# Altium PCB Sound_Sensor_v3.1.PcbDoc (part 2 of 3)
Units mm, origin at the board's own origin, x right, y up, seen from the top; angles counter-clockwise.
Board outline 69.99 x 68.25 mm, 2 copper layers (Top Layer, Bottom Layer), stack 1.448 mm thick; 83 components, 60 nets, 303 pads, 87 vias.
Unrouted connection lines stored in the file: 2.
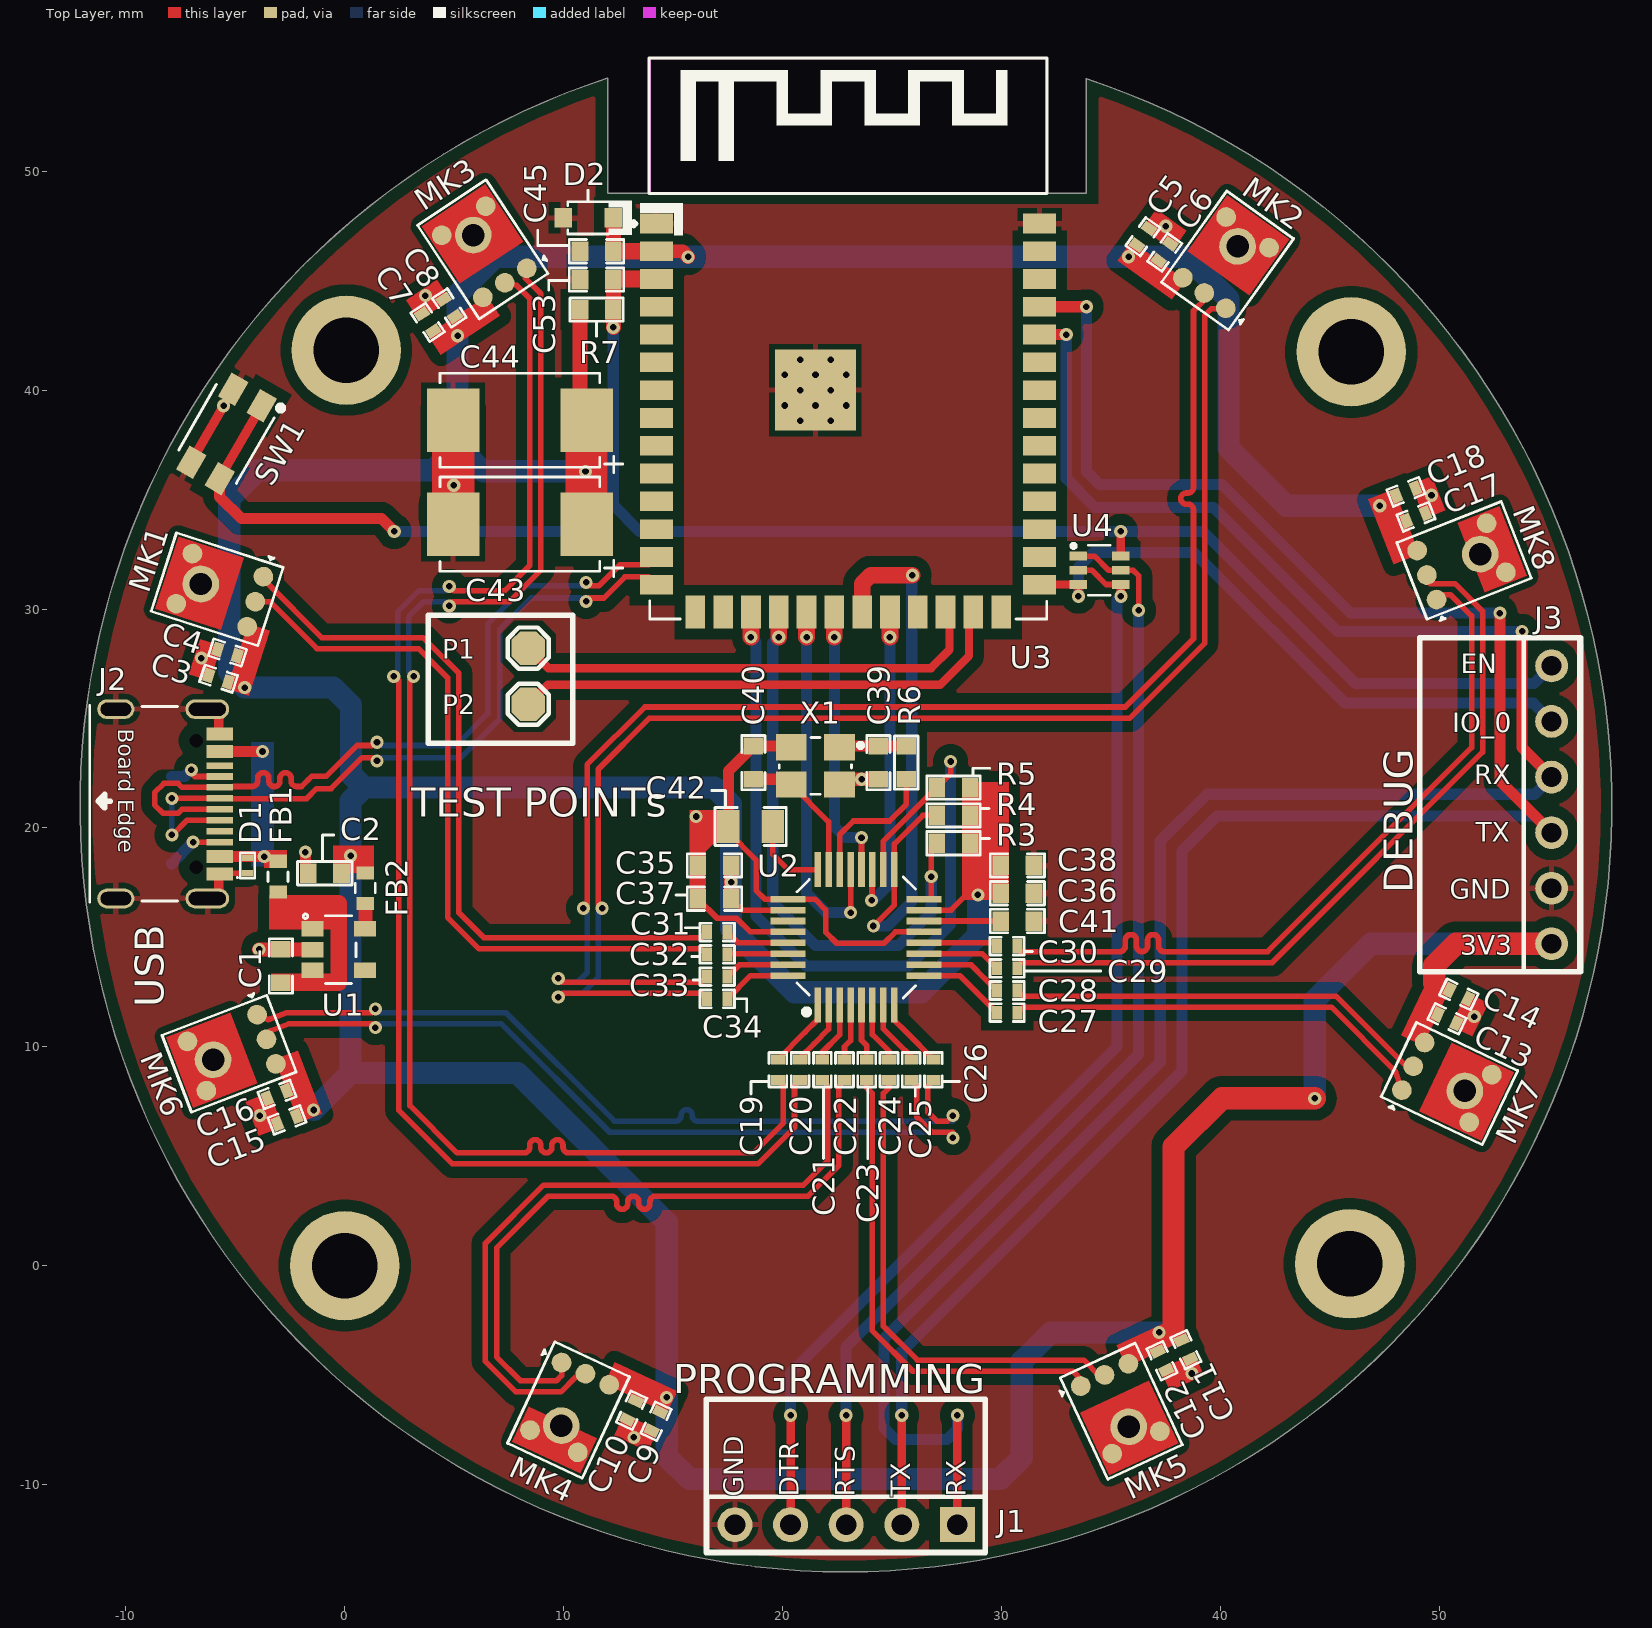
[diagram p0: Top Layer view]

## Part data (continued)
R3 R4 R5: library part CRGH0603J100K, "RES SMD 100K OHM 5% 1/5W 0603", Case Code (Imperial)=0603, Case Code (Metric)=1608, LCSC Part Number=C2074142, Manufacturer="TE Connectivity", Max Operating Temperature=125°C, Min Operating Temperature=-55°C, Number of Resistors=1, Power Rating=200mW, Resistance=100kR, Resistance Tolerance=5%, Resistor Type="Thick Film,Power resistor", Supplier Part Number 1=A126393DKR-ND, Temperature Coefficient=100ppm/°C, Voltage Rating=50V, Case/Package=0603, ComponentLink1Description=http://www.farnell.com/datasheets/2007183.pdf?src-supplier=Element14, ComponentLink1URL=http://www.farnell.com/datasheets/2007183.pdf?src-supplier=Element14, Depth=0.8mm, ELV=Compliant, Height=0.45mm, Item Type=Resistor, Length=1.6mm, Manufacturer Part Number=CRGH0603J100K, Mount="Surface Mount", Number of Terminations=2, Packaging="Tape and Reel", Pricing 1="1=0.1, 10=0.049, 100=0.02, 1000=0.00899, 2500=0.0078 (USD)", REACH SVHC="No SVHC", RoHS Compliant=Yes, Series=CRGH, Stock 1=23277, Supplier 1=Digi-Key, Technology="THICK FILM", Termination=Solder, Tolerance=5%, Voltage Rating (DC)=50V, Width=0.8mm
R6: library part RC0603JR-070RL, "RES 0 OHM JUMPER 1/10W 0603", Case Code (Imperial)=0603, Case Code (Metric)=1608, LCSC Part Number=C95177, Manufacturer=Yageo, Max Operating Temperature=155°C, Max Power Dissipation=100mW, Min Operating Temperature=-55°C, Package Quantity=5000, Resistance=0mR, Resistance Tolerance=5%, Resistor Type="Thick Film", Supplier Part Number 1=311-0.0GRCT-ND, Temperature Coefficient=200ppm/°C, Tolerance=1%, Voltage Rating=50V, Case/Package=0603, Category="Chip SMD Resistors", Construction=Rectangular, Contact Plating=Tin,Matte, Depth=0.8mm, Features="Moisture Resistant", Height=0.45mm, Item Type=Resistor, Lead Free="Lead Free", Length=1.6mm, Manufacturer Part Number=RC0603JR-070RL, Military Standard=Not, Number of Pins=2, Number of Terminations=2, Packaging="Tape and Reel", Power Rating=100mW, Pricing 1="1=0.10000, 10=0.01700, 25=0.01240, 50=0.00960, 100=0.00700, 250=0.00536, 500=0.00430, 1000=0.00316 (USD)", Radiation Hardening=No, Reach SVHC Compliant="No SVHC", RoHS=Yes, RoHS Compliant=Yes, Series=RC, Size Code=0603, Stock 1=18081776, Supplier 1=Digi-Key, Technology="THICK FILM", Termination=SMD/SMT, Voltage Rating (DC)=50V, Width=0.8mm
R7: library part AC0603JR-0710KL, "RES SMD 10K OHM 5% 1/10W 0603", Case Code (Imperial)=0603, Case Code (Metric)=1608, LCSC Part Number=C140867, Manufacturer=Yageo, Max Operating Temperature=155°C, Max Power Dissipation=100mW, Min Operating Temperature=-55°C, Package Quantity=1, Resistance=10kR, Resistor Type="Thick Film", Supplier Part Number 1=1029044, Temperature Coefficient=100ppm/°C, Tolerance=5%, Voltage Rating=50V, Case/Package=0603, Category="Chip SMD Resistors", ComponentLink1Description=https://datasheet.ciiva.com/5562/pyu-ac-51-rohs-l-2-5562553.pdf?src-supplier=Mouser, ComponentLink1URL=https://datasheet.ciiva.com/5562/pyu-ac-51-rohs-l-2-5562553.pdf?src-supplier=Mouser, Construction=Rectangular, Depth=0.8mm, Features="Moisture Resistant,Automotive AEC-Q200,Anti-Sulfur", Height=0.022inch, Item Type=Resistor, Lead Free="Lead Free", Length=0.063inch, Manufacturer Part Number=AC0603JR-0710KL, Military Standard=Not, Number of Terminations=2, Packaging="Tape and Reel", Power Rating=100mW, Pricing 1="5000=0.00540 (USD)", RoHS=Yes, RoHS Compliant=Yes, Series=AC, Size Code=0603, Stock 1=1533000, Supplier 1="Future Electronics", Termination=SMD/SMT, Width=0.031inch
SW1: library part TS-1185EC-C-D-B, "3mm 2mm Round Button 50mA Top3.65mm SPST 12V SMD Tactile Switches", Manufacturer=XKB, Package=Custom, ComponentLink1Description=LCSC, ComponentLink1URL=https://lcsc.com/product-detail/Tactile-Switches_XKB-Connectivity-TS-1185EC-C-D-B_C318893.html, Manufacturer Part No=TS-1185EC-C-D-B
U1: "Linear Voltage Regulator IC Positive Fixed 1 Output 3.3V 1A SOT-25", Case/Package=SOT-25, Dropout Voltage=655mV, Manufacturer=Torex, Max Input Voltage=6V, Max Operating Temperature=85°C, Min Current Limit=1.005A, Min Input Voltage=1.6V, Min Operating Temperature=-40°C, Nominal Output Voltage=3.3V, Output Current=1A, Package Quantity=1, Supplier Part Number 1=84R0738, Category="Voltage Regulators - Linear", ComponentLink1Description=https://datasheet.ciiva.com/7992/610888-7992813.pdf?src-supplier=Element14, ComponentLink1URL=https://datasheet.ciiva.com/7992/610888-7992813.pdf?src-supplier=Element14, ComponentLink2Description=https://datasheet.ciiva.com/5755/610888-5755886.pdf?src-supplier=Farnell, ComponentLink2URL=https://datasheet.ciiva.com/5755/610888-5755886.pdf?src-supplier=Farnell, ComponentLink3Description=https://datasheet.ciiva.com/2040/xc6220-2040201.pdf?src-supplier=Digi-Key, ComponentLink3URL=https://datasheet.ciiva.com/2040/xc6220-2040201.pdf?src-supplier=Digi-Key, ComponentLink4Description=https://datasheet.ciiva.com/2040/xc6220-2040200.pdf?src-supplier=Digi-Key, ComponentLink4URL=https://datasheet.ciiva.com/2040/xc6220-2040200.pdf?src-supplier=Digi-Key, ComponentLink5Description=https://datasheet.ciiva.com/2040/xc6220-2040202.pdf?src-supplier=Digi-Key, ComponentLink5URL=https://datasheet.ciiva.com/2040/xc6220-2040202.pdf?src-supplier=Digi-Key, Manufacturer Part Number=XC6220B331MR-G, Mount="Surface Mount", Number of Pins=5, Number of Regulators=1, Output Type=Fixed, Output Voltage=3.3V, Packaging="Tape and Reel", Pricing 1="1=1.20000, 10=1.08000, 100=0.83900, 500=0.69300, 1000=0.54800 (USD)", REACH SVHC="No SVHC", RoHS=Yes, RoHS Compliant=Yes, Series=-, Stock 1=3078, Supplier 1=Newark
U2: "IC ADC 24BIT SIGMA-DELTA 32TQFP", Manufacturer="Texas Instruments", Supplier Part Number 1=595-ADS131M08IPBSR, Category="Analog to Digital Converters (ADCs)", Manufacturer Part Number=ADS131M08IPBSR, Pricing 1="1=8.85000, 10=7.99000, 50=7.62000, 100=6.62000, 1000=5.39000, 10000=5.39000 (USD)", RoHS=Yes, Supplier 1=Mouser
U3: "SMD,18x25.5mm WiFi Modules ROHS", LCSC Part Number=C2913204, Manufacturer="Espressif Systems", Supplier Part Number 1=1965-ESP32-S3-WROOM-1-N8R2-ND, Category=Uncategorized, ComponentLink1Description=LCSC, ComponentLink1URL=https://www.lcsc.com/product-detail/WiFi-Modules_Espressif-Systems-ESP32-S3-WROOM-1-N8R2_C2913204.html, Item Type=Module, Manufacturer Part Number=ESP32-S3-WROOM-1-N8R2, RoHS=No, Supplier 1=Digi-Key
U4: "2 NPN pre-biased (Dual) 150mW 100mA 50V SC-70-6(SOT-363) Digital Transistors ROHS", Manufacturer=Changjiang, Package=SC-70-6(SOT-363), ComponentLink1Description=LCSC, ComponentLink1URL=https://www.lcsc.com/product-detail/Digital-Transistors_Changjiang-Electronics-Tech-CJ-UMH3N_C62892.html, Manufacturer Part No=UMH3N
X1: "8.192MHz SMD Crystal Resonator 12pF 150Ω ±10ppm ±30ppm -40℃~+85℃ SMD_3225_4P Crystals ROHS", Manufacturer=JYJE, Package=Custom, Manufacturer Part No=3TJ481920NYLBC

## Free pads (board coordinates)
  round 5 hole 3: MH1(0.068,41.835) MH2(0,0) MH3(45.923,0.08) MH4(45.992,41.755)

## Via types
v1: diameter 0.6, hole 0.3, Top Layer to Bottom Layer, 87 vias

## Nets (pads, with @x,y where several pads share a name; then routed paths per layer and width w, separated by ;. In a path a pad name is that pad's centre, name@x,y a point inside that pad or via, vN(x,y) a via of type N, cw(c..) or ccw(c..) an arc to the next point about the centre after c; other vN are vias at no path point)
3V3: C2.1 C3.1 C4.1 C5.1 C6.1 C7.1 C8.1 C9.1 C10.1 C11.1 C12.1 C13.1 C14.1 C15.1 C16.1 C17.1 C18.1 C35.1 C36.1 C37.1 C38.1 C43.1 C44.1 C45.1 C46.1 C47.1 C48.1 C49.1 C50.1 C51.1 C52.1 D2.1 FB2.2 J3.6 MK1.5 MK2.5 MK3.5 MK4.5 MK5.5 MK6.5 MK7.5 MK8.5 R3.2 R4.2 R5.2 R7.1 U2.15 U2.26 U3.2 | length 265.6
  Top Layer w0.254: C37.1@17.653,16.764 18.167,16.25 U2.26@20.26,16.25 ; U2.15@26.46,16.25 27.705,16.25 28.499,17.043 28.499,18.625 29.273,19.399 ; v1(28.931,16.942) 29.007,17.018 C36.1@29.972,17.018
  Top Layer w0.381: C2.1@-0.152,17.932 C2.1@-0.102,17.983 ; FB2.2@0.926,17.856 FB2.2@0.94,17.87 ; C45.1@12.275,46.362 D2.1@12.275,47.879
  Top Layer w0.635: U3.2@14.25,46.355 15.429,46.355 v1(15.689,46.095) ; C37.1@17.653,16.764 v1(17.653,17.526) C35.1@17.653,18.288
  Top Layer w0.686: C44.1@10.744,38.94 R7.1@10.744,43.688 ; C45.1@12.268,46.355 D2.1@12.268,47.872
  Top Layer w0.762: C44.1@10.744,38.94 C44.1@11.051,38.633 ; C45.1@12.268,46.355 12.275,46.362 C45.1@12.294,46.38 ; D2.1@12.268,47.872 D2.1@12.275,47.879 ; C45.1@12.294,46.355 U3.2@14.25,46.355
  Top Layer w1.016: 37.871,-3.073 37.871,5.436 40.081,7.645 v1(44.323,7.645) ; 49.784,12.903 49.784,13.716 50.775,14.707 J3.6@55.144,14.707
  Bottom Layer w1.016: v1(-1.422,7.112) 0.267,8.801 ; v1(10.998,36.297) 6.328,36.297 5.156,37.469 ; v1(28.931,16.942) 28.931,15.088 26.34,12.497 20.549,12.497 17.653,15.392 v1(17.653,17.526) 17.653,21.082 16.891,21.844 0.875,21.844 ; v1(37.211,-3.048) 32.258,-3.048 30.937,-4.369 30.937,-8.763 29.947,-9.754 15.748,-9.754 14.707,-8.712 v1(14.707,-6.02) 14.707,1.981 7.887,8.801 0.267,8.801 ; v1(44.323,7.645) 44.323,12.141 46.889,14.707 J3.6@55.144,14.707 ; v1(47.295,34.722) 43.028,34.722 40.386,37.363 40.386,44.171 38.456,46.101 v1(35.814,46.101) C46.1@24.206,46.101 C47.1@22.86,46.101 C48.1@21.539,46.101 C49.1@20.193,46.101 C50.1@18.847,46.101 C51.1@17.526,46.101 C52.1@16.205,46.101 6.883,46.101 5.156,44.374 v1(5.156,42.494) 5.156,37.469 ; 0.267,8.801 0.267,21.236 0.875,21.844 ; 0.875,21.844 0.279,22.439 0.279,25.603 -0.533,26.416 v1(-4.572,26.416) -5.283,27.127 -5.283,35.027 -3.962,36.347 4.035,36.347 5.156,37.469
  other v1: 0.267,18.732
5V: C1.1 FB1.2 U1.1 U1.3 | length 3.7
  Top Layer w0.381: U1.1@-1.498,15.367 U1.1@-1.473,15.392
  Top Layer w0.762: -0.279,12.929 -0.279,16.561
\C\S\: R4.1 U2.17 U3.21 | length 27.5
  Top Layer w0.254: v1(24.155,15.519) 25.11,16.474 U2.17@25.11,18.1 25.11,19.268 26.416,20.574 R4.1@27.051,20.574
  Top Layer w0.762: U3.21@23.64,29.865 23.64,31.158 24.028,31.547 v1(25.933,31.547)
  Bottom Layer w0.508: v1(24.155,15.519) 24.79,15.519 25.908,16.637 25.908,28.25 25.908,31.521 v1(25.933,31.547)
\D\R\D\Y\: R5.1 U2.18 U3.17 | length 38.2
  Top Layer w0.254: U2.18@24.61,18.1 24.61,19.403 R5.1@27.051,21.844 27.679,22.472 v1(27.679,23.038)
  Top Layer w0.762: v1(18.56,28.72) U3.17@18.56,29.865
  Bottom Layer w0.508: v1(18.56,28.72) 18.796,28.484 18.796,15.977 21.082,13.691 25.781,13.691 27.686,15.596 v1@27.686,22.987
\R\E\S\E\T\: R3.1 U2.16 U3.18 | length 26.7
  Top Layer w0.254: U2.16@26.46,16.75 26.749,16.75 26.797,16.798 v1(26.797,17.78) 26.797,19.05 R3.1@27.051,19.304
  Top Layer w0.762: v1(19.83,28.72) U3.18@19.83,29.865
  Bottom Layer w0.508: v1(19.83,28.72) 19.558,28.448 19.558,16.586 21.514,14.63 25.298,14.63 26.797,16.129 v1(26.797,17.78)
ADC1_XIN: R6.1 U2.22 | length 6.4
  Top Layer w0.254: U2.22@22.61,18.1 22.61,19.689 23.241,20.32 24.892,20.32 25.654,21.082 R6.1@25.654,22.225
ADC1_XOUT#: C40.2 U2.23 X1.3 | length 6.4
  Top Layer w0.254: X1.3@20.167,22.225 X1.3@20.406,21.986 22.11,20.282 U2.23@22.11,18.1
  Top Layer w0.508: C40.2@18.669,22.225 X1.3@20.167,22.225
CAP: C42.2 U2.24 | length 3.6
  Top Layer w0.254: C42.2@19.558,20.066 19.558,18.796 20.254,18.1 U2.24@21.61,18.1
"DEBUG SIG.ENABLE": C53.1 J3.1 R7.2 SW1.1 U3.3 U4.6 | length 80
  Top Layer w0.381: U4.6@35.463,32.425 v1@35.463,33.553
  Top Layer w0.508: SW1.1@-5.72,35.962 -5.72,35.133 -4.724,34.138 1.676,34.138 v1(2.261,33.553)
  Top Layer w0.686: v1(12.268,42.875) R7.2@12.268,43.688 C53.1@12.268,45.06
  Top Layer w0.762: C53.1@12.268,45.06 12.294,45.085 U3.3@14.25,45.085
  Bottom Layer w0.508: v1(2.261,33.553) 11.074,33.553 12.268,34.747 ; v1(12.268,42.875) 12.268,34.747 ; J3.1@55.144,27.407 54.331,26.594 46.177,26.594 39.218,33.553 v1(35.458,33.553) 13.462,33.553 12.268,34.747
"DEBUG SIG.IO_0": J3.2 U3.27 U4.3 | length 28.8
  Top Layer w0.254: U3.27@31.75,31.115 U3.27@31.76,31.125 ; v1@33.523,30.536 v1(33.523,30.586)
  Top Layer w0.381: U3.27@31.76,31.125 U4.3@33.523,31.125 v1(33.523,30.586)
  Bottom Layer w0.508: v1(33.523,30.586) 33.523,31.923 34.188,32.588 38.811,32.588 45.695,25.705 54.306,25.705 J3.2@55.144,24.867
DTR: J1.4 U4.2 U4.4 | length 51.4
  Top Layer w0.254: U4.2@33.523,31.775 34.138,31.775 34.788,31.125 U4.4@35.463,31.125
  Top Layer w0.381: J1.4@20.371,-11.837 v1(20.371,-6.833) ; v1(35.463,30.586) U4.4@35.463,31.125
  Bottom Layer w0.508: v1(20.371,-6.833) 20.371,-4.902 35.281,10.008 35.281,30.404 v1(35.463,30.586)